# Altium PCB TuringSMD - Copy.PcbDoc (part 1 of 2)
Units mm, origin at the board's own origin, x right, y up, seen from the top; angles counter-clockwise.
Board outline 28 x 100 mm, 2 copper layers (Top Layer, Bottom Layer); 77 components, 85 nets, 274 pads, 71 vias.
Unrouted connection lines stored in the file: 107.
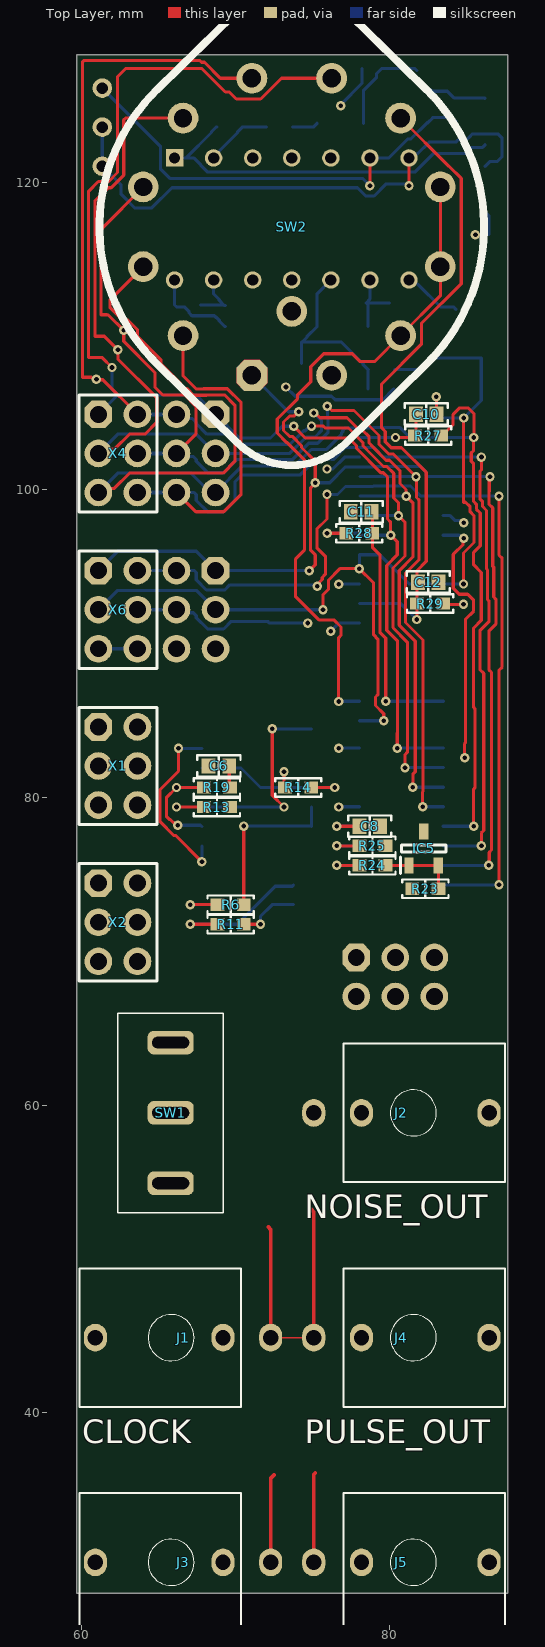
[diagram p0: Top Layer view]
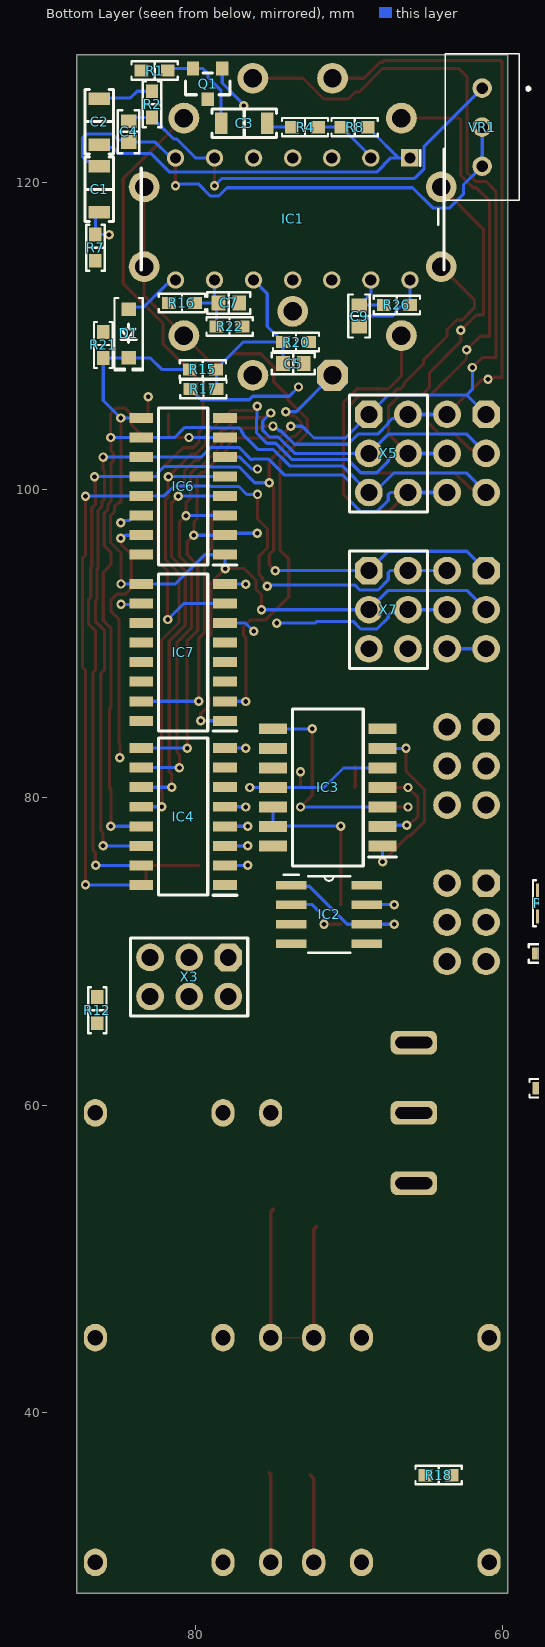
[diagram p1: Bottom Layer view, seen from below]

## Layer stack, top to bottom
Top Solder: solder mask 0.0102, Solder Resist, Dk 3.5
Top Layer: signal copper 0.0356
Dielectric 1: dielectric 0.32, FR-4, Dk 4.8
Bottom Layer: signal copper 0.0356
Bottom Solder: solder mask 0.0102, Solder Resist, Dk 3.5

## Board outline
59.69,28.27 59.69,128.27 87.69,128.27 87.69,28.27

## Design rules (kind name [scope] priority, off if disabled: settings)
BoardOutlineClearance [All] p1: gap=0.254 ignorepadtopadclearanceinfootprint=FALSE except(0: Arc-SplitContinuation Track-SplitContinuation SMDPad-SplitContinuation THPad-SplitContinuation Via-SplitContinuation Fill-SplitContinuation Poly-SplitContinuation Region-SplitContinuation Text-SplitContinuation)
Clearance [All] p1: gap=0.254 ignorepadtopadclearanceinfootprint=FALSE except(0.203: Arc-Arc Arc-Track Arc-SMDPad Arc-Fill Arc-Poly Arc-Region Track-Track Track-SMDPad Track-Fill Track-Poly Track-Region SMDPad-SMDPad SMDPad-Fill SMDPad-Poly SMDPad-Region)
PolygonConnect [All] p1: thpad.connectstyle=Relief thpad.reliefconductorwidth=0.254 thpad.reliefentries=4 thpad.polygonreliefangle="90 Angle" thpad.airgapwidth=0.254 smdpad.connectstyle=Relief smdpad.reliefconductorwidth=0.254 smdpad.reliefentries=4 smdpad.polygonreliefangle="90 Angle" smdpad.airgapwidth=0.254 via.connectstyle=Direct via.reliefconductorwidth=0.254 via.reliefentries=4 via.polygonreliefangle="90 Angle" via.airgapwidth=0.254
RoutingVias [All] p1: holewidth=0.305 width=0.61 viastyle="Through Hole" minholewidth=0.305 minwidth=0.61 maxholewidth=0.305 maxwidth=0.61
SolderMaskExpansion [All] p1: expansion=0.102 istentingtop=FALSE
Width [All] p1: maxlimit=0.635 minlimit=0.203 preferedwidth=0.203
30 further rules are at their usual default settings.

## Components (designator, comment, footprint, x,y, rotation, side; value= is the part's Value field where it differs from the comment)
C1 "0.47 µF" "CAP FILM 1206" 86.233,119.531 r270 bottom
C2 "0.47 µF" "CAP FILM 1206" 86.233,123.928 r90 bottom
C3 "0.47 µF" "CAP FILM 1206" 76.811,123.825 r180 bottom
C4 "1000 pF" "CAP 0603_1608" 84.328,123.277 r270 bottom
C5 "330 pF" "CAP 0603_1608" 73.62,108.204 r0 bottom
C6 "1000 pF" "CAP 0603_1608" 68.921,82.042 r0 top
C7 "0.1 µF" "CAP 0603_1608" 77.811,112.141 r0 bottom
C8 "10000 pF" "CAP 0603_1608" 78.731,78.121 r180 top
C9 "1000 pF" "CAP 0603_1608" 69.342,111.292 r270 bottom
C10 "1000 pF" "CAP 0603_1608" 82.403,104.918 r180 top
C11 "1000 pF" "CAP 0603_1608" 78.172,98.568 r0 top
C12 "1000 pF" "CAP 0603_1608" 82.53,93.996 r180 top
C13 "0.1 µF" "CAP 0603_1608" 136.144,59.944 r270 bottom
C14 "0.1 µF" "CAP 0603_1608" 141.732,59.944 r270 bottom
C15 "0.1 µF" "CAP 0603_1608" 147.32,59.944 r270 bottom
C16 "0.1 µF" "CAP 0603_1608" 152.908,59.944 r270 bottom
C17 "0.1 µF" "CAP 0603_1608" 158.496,59.944 r270 bottom
C18 "0.1 µF" "CAP 0603_1608" 164.084,59.944 r270 bottom
C19 "0.1 µF" "CAP 0603_1608" 101.854,59.944 r270 bottom
C20 "0.1 µF" "CAP 0603_1608" 107.442,59.944 r270 bottom
C21 "0.1 µF" "CAP 0603_1608" 114.046,60.706 r0 bottom
C22 "0.1 µF" "CAP 0603_1608" 118.618,59.944 r270 bottom
C23 "0.1 µF" "CAP 0603_1608" 124.46,59.944 r270 bottom
C24 "0.1 µF" "CAP 0603_1608" 130.302,59.944 r270 bottom
D1 "1N4148W-TP" SOD-123 84.328,110.16 r270 bottom
IC1 "TL074CN" DIP794W53P254L1930H508Q14N 73.66,117.602 r270 bottom
IC2 "TL072ACP" SOIC-8 71.298,72.39 r180 bottom
IC3 "CD4016BNSR" SOIC127P780X200-14N 71.374,80.645 r0 bottom
IC4 "DAC0800LCM_NOPB" SOIC127P600X175-16N 80.781,78.756 r0 bottom
IC5 "TL431MFDT,215" SOT95P230X110-3N 82.239,76.681 r90 top
IC6 "CD4015BM96" SOIC127P600X175-16N 80.781,100.219 r0 bottom
IC7 "CD4015BM96" SOIC127P600X175-16N 80.781,89.424 r0 bottom
J1 "CLOCK" THONKICONN 72.29,44.879 r90 top
J2 "NOISE_OUT" THONKICONN 75.09,59.488 r270 top
J3 "CV_IN" THONKICONN 72.29,30.27 r90 top
J4 "PULSE_OUT" THONKICONN 75.09,44.879 r270 top
J5 "CV OUT" THONKICONN 75.09,30.27 r270 top
Q1 "MMBT3904-7-F" "DIODES SOT-23-3" 79.187,126.381 r270 bottom
R1 "100 kOhms" "YAGEO RES 0603_1608" 82.638,127.254 r0 bottom
R2 "1 kOhms" "YAGEO RES 0603_1608" 82.804,125.056 r90 bottom
R3 "1 kOhms" "YAGEO RES 0603_1608" 56.769,61.087 r0 bottom
R4 "10 kOhms" "YAGEO RES 0603_1608" 72.859,123.571 r0 bottom
R5 "10 kOhms" "YAGEO RES 0603_1608" 56.046,73.113 r90 bottom
R6 "100 kOhms" "YAGEO RES 0603_1608" 69.684,73.025 r0 top
R7 "100 kOhms" "YAGEO RES 0603_1608" 86.487,115.736 r270 bottom
R8 "470 kOhms" "YAGEO RES 0603_1608" 69.635,123.571 r180 bottom
R9 "100 kOhms" "YAGEO RES 0603_1608" 57.443,73.113 r90 bottom
R10 "10 kOhms" "YAGEO RES 0603_1608" 56.808,69.85 r0 bottom
R11 "47 kOhms" "YAGEO RES 0603_1608" 69.684,71.755 r180 top
R12 "1 kOhms" "YAGEO RES 0603_1608" 86.36,66.167 r270 bottom
R13 "10 kOhms" "YAGEO RES 0603_1608" 68.795,79.375 r0 top
R14 "10 kOhms" "YAGEO RES 0603_1608" 74.08,80.645 r180 top
R15 "470 kOhms" "YAGEO RES 0603_1608" 79.502,107.823 r0 bottom
R16 "68 kOhms" "YAGEO RES 0603_1608" 80.86,112.141 r0 bottom
R17 "15 kOhms" "YAGEO RES 0603_1608" 79.463,106.553 r0 bottom
R18 "51 kOhms" "YAGEO RES 0603_1608" 64.174,35.941 r0 bottom
R19 "10 kOhms" "YAGEO RES 0603_1608" 68.795,80.645 r180 top
R20 "100 kOhms" "YAGEO RES 0603_1608" 73.445,109.601 r0 bottom
R21 "10 kOhms" "YAGEO RES 0603_1608" 85.979,109.41 r270 bottom
R22 "15 kOhms" "YAGEO RES 0603_1608" 77.763,110.617 r0 bottom
R23 "3.3 kOhms" "YAGEO RES 0603_1608" 82.344,74.057 r180 top
R24 "1.6 kOhms" "YAGEO RES 0603_1608" 78.906,75.581 r0 top
R25 "1.6 kOhms" "YAGEO RES 0603_1608" 78.906,76.851 r0 top
R26 "5.1 kOhms" "YAGEO RES 0603_1608" 66.89,112.014 r180 bottom
R27 "10 kOhms" "YAGEO RES 0603_1608" 82.529,103.521 r0 top
R28 "10 kOhms" "YAGEO RES 0603_1608" 78.046,97.171 r180 top
R29 "10 kOhms" "YAGEO RES 0603_1608" 82.656,92.599 r0 top
SW1 "Toggle SW" "TOGGLE SW" 65.786,59.488 r0 top
SW2 "SW Rotary" SW_ROTARY 73.66,117.094 r180 top
VR1 "1meg" 3296X1223LF 61.341,123.571 r0 bottom
X1 "Connector, 6pin, 2.54mm, 500VAC, 3A" "CON: PBD-6" 62.357,82.042 r270 top
X2 "Connector, 6pin, 2.54mm, 500VAC, 3A" "CON: PBD-6" 62.357,71.882 r270 top
X3 "Connector, 6pin, 2.54mm, 500VAC, 3A" "CON: PBD-6" 80.391,68.326 r0 bottom
X4 "Connector, 6pin, 2.54mm, 500VAC, 3A" "CON: PBD-6" 62.357,102.362 r270 top
X5 "Connector, 6pin, 2.54mm, 500VAC, 3A" "CON: PBD-6" 67.437,102.362 r270 bottom
X6 "Connector, 6pin, 2.54mm, 500VAC, 3A" "CON: PBD-6" 62.357,92.202 r270 top
X7 "Connector, 6pin, 2.54mm, 500VAC, 3A" "CON: PBD-6" 67.437,92.202 r270 bottom

## Footprints (in the part's own frame and the unit in brackets; to place one, negate y for a bottom-side part, rotate by r counter-clockwise, add the part's x,y. Pads: shape width x height; smd on the part's side, far side on the other; paste and mask are expansions set on the pad)
3296X1223LF [mm]
  round 1.269 hole 0.74: 1(0,-2.54) 2(0,0) 3(0,2.54)
  silkscreen extent -3.1,-4.76 2.41,4.76, body extent -2.07,-4.75 2.76,6.3, height 10.03
"CAP 0603_1608" [mm] "Chip Capacitor, 2-Leads, Body 1.60x0.80mm, IPC Medium Density"
  rect 0.9x1 smd: 1(-0.675,0) 2(0.675,0)
  silkscreen extent -1.4,-0.7 1.4,0.7, body extent -0.8,-0.41 0.8,0.41, height 0.82
"CAP FILM 1206" [mm] "H1, Film Capacitor PPS, 2-Leads, Body 3.20x1.60mm, IPC Medium Density"
  rect 0.8x1.4 smd: 1(-1.5,0) 2(1.5,0)
  silkscreen extent -2.1,-0.92 2.1,0.92, body extent -1.6,-0.8 1.6,0.8, height 1
"CON: PBD-6" [mm] "PBD-6"
  oct 1.8x1.8 hole 1.1: 1(-2.54,-1.27)
  round 1.8 hole 1.1: 2(-2.54,1.27) 3(0,-1.27) 4(0,1.27) 5(2.54,-1.27) 6(2.54,1.27)
  silkscreen extent -3.81,-2.54 3.81,2.54, body extent -3.81,-2.54 3.81,2.54, height 8.5
"DIODES SOT-23-3" [mm] "SOT23, 3-Leads, Body 2.90x2.40mm, Pitch 0.95mm, IPC Medium Density"
  rect 0.9x0.8 smd: 1(-1,0.95) 2(-1,-0.95) 3(1,0)
  silkscreen extent -0.7,-1.45 0.7,1.45, body extent -1.41,-1.45 1.41,1.45, height 1.5
DIP794W53P254L1930H508Q14N [mm]
  rect 1.13x1.13 hole 0.73: 1(-3.97,7.62)
  round 1.13 hole 0.73: 2(-3.97,5.08) 3(-3.97,2.54) 4(-3.97,0) 5(-3.97,-2.54) 6(-3.97,-5.08) 7(-3.97,-7.62) 8(3.97,-7.62) 9(3.97,-5.08) 10(3.97,-2.54) 11(3.97,0) 12(3.97,2.54) 13(3.97,5.08) 14(3.97,7.62)
  silkscreen extent -4.53,-9.84 3.3,9.84, body extent -3.94,-9.84 3.94,9.84, height 5.27
SOD-123 [mm] "SOD, 2-Leads, Body 1.55x3.70mm, IPC Medium Density"
  rect 0.9x0.95 smd: 1(-1.575,0) 2(1.575,0)
  silkscreen extent -2.3,-0.92 2.41,0.92, body extent -1.86,-0.78 1.86,0.77, height 1.35
SOIC127P600X175-16N [mm]
  rect 1.55x0.65 smd: 1(-2.725,4.445) 2(-2.725,3.175) 3(-2.725,1.905) 4(-2.725,0.635) 5(-2.725,-0.635) 6(-2.725,-1.905) 7(-2.725,-3.175) 8(-2.725,-4.445) 9(2.725,-4.445) 10(2.725,-3.175) 11(2.725,-1.905) 12(2.725,-0.635) 13(2.725,0.635) 14(2.725,1.905) 15(2.725,3.175) 16(2.725,4.445)
  silkscreen extent -3.5,-5.1 1.6,5.12, body extent -3,-5.1 3,5.1, height 1.75
SOIC127P780X200-14N [mm]
  rect 1.825x0.7 smd: 1(-3.562,3.81) 2(-3.562,2.54) 3(-3.562,1.27) 4(-3.562,0) 5(-3.562,-1.27) 6(-3.562,-2.54) 7(-3.562,-3.81) 8(3.562,-3.81) 9(3.562,-2.54) 10(3.562,-1.27) 11(3.562,0) 12(3.562,1.27) 13(3.562,2.54) 14(3.562,3.81)
  silkscreen extent -4.47,-5.1 2.3,5.1, body extent -3.9,-5.1 3.9,5.1, height 2
SOIC-8 [mil]
  rect 78x22 smd: 1(-97,75) 2(-97,25) 3(-97,-25) 4(-97,-75) 5(97,-75) 6(97,-25) 7(97,25) 8(97,75)
  silkscreen extent -117,-98 54,101, body extent -116,-96 116,96, height 65
SOT95P230X110-3N [mm]
  rect 1.05x0.6 smd: 1(-1.1,0.95) 2(-1.1,-0.95) 3(1.1,0)
  silkscreen extent -1.63,-1.45 0.23,1.5, body extent -1.2,-1.45 1.2,1.45, height 0.95
SW_ROTARY [mm] "RS25 rotary switch from ali"
  oct 2x2 hole 1.2: 1(2.588,9.659)
  round 2 hole 1.2: 2(7.071,7.071) 3(9.659,2.588) 4(9.659,-2.588) 5(7.071,-7.071) 6(2.588,-9.659) 7(-2.588,-9.659) 8(-7.071,-7.071) 9(-9.659,-2.588) 10(-9.659,2.588) 11(-7.071,7.071) 12(-2.588,9.659) A(0,5.5)
  Top Layer region: 1.588,10.159 2.088,10.659 3.088,10.659 3.588,10.159 3.588,9.159 3.088,8.659 2.088,8.659 1.588,9.159
  Bottom Layer region: 1.588,10.159 2.088,10.659 3.088,10.659 3.588,10.159 3.588,9.159 3.088,8.659 2.088,8.659 1.588,9.159
  silkscreen extent -12.5,-15.5 12.5,15.5, body extent -12.5,-15.5 12.5,15.5, height 31
THONKICONN [mm]
  oval 1.8x1.5 hole 1: 1(0,0) 2(0,3.1) 3(0,11.4)
  silkscreen extent -4.5,1.93 4.5,12.42, body extent -4.47,-0.18 4.53,12.45, height 14.5
"TOGGLE SW" [mil] "3 PIN TOGGLE SWITCH SPDT"
  rrect50% 118.11x60 hole 30 slot 94.49 at 0 deg: 1(0,180) 2(0,0) 3(0,-180)
  silkscreen extent -135,-255 135,255, body extent -236,-251 237,278, height 1129
"YAGEO RES 0603_1608" [mm] "Chip Resistor, 2-Leads, Body 1.60x0.80mm"
  rect 0.9x0.8 smd: 1(-0.85,0) 2(0.85,0)
  silkscreen extent -1.5,-0.6 1.5,0.6, body extent -0.8,-0.4 0.8,0.4, height 0.45

## Part data
C1 C2 C3: library part ECP-U1C474MA5, "CAP FILM 0.47UF 20% 16VDC 1206", Device Package="1206 (3216 Metric)", Dielectric Material="Acrylic, Metallized - Stacked", Manufacturer="Panasonic Electronic Components", Operating Temperature="-40°C ~ 85°C", Supplier Part Number 1=PCF1130CT-ND, Tolerance=±20%, Voltage Rating - AC=12V, Voltage Rating - DC=16V, Applications="EMI, RFI Suppression", Capacitance="0.47 µF", ComponentLink1Description=Datasheet, ComponentLink1URL=http://industrial.panasonic.com/www-cgi/jvcr13pz.cgi?E+PZ+3+ABD0012+ECPU1C474MA5+7+WW, ComponentLink2Description="DigiKey Link", ComponentLink2URL=https://www.digikey.com/en/products/detail/panasonic-electronic-components/ECP-U1C474MA5/285450, Features="Low ESR", Height - Seated (Max)="0.063\" (1.60mm)", LastUpdated="6/3/2024 8:14:42 PM", Lifecycle Status=Active, Minimum Order=1, Mounting Type="Surface Mount", Package / Case="1206 (3216 Metric)", Packaging=TapeAndReel, Part Number=ECP-U1C474MA5, Part Status=Active, Price=0.22, Series=ECP-U(A), Size / Dimension="0.126\" L x 0.063\" W (3.20mm x 1.60mm)", Supplier 1=DigiKey, Termination="Solder Pads"
C4 C6 C9 C10 C11 C12: library part C1608X8R1H102K080AA, "CAP CER 1000PF 50V X8R 0603", Device Package="0603 (1608 Metric)", Manufacturer="TDK Corporation", Operating Temperature="-55°C ~ 150°C", Supplier Part Number 1=445-2501-1-ND, Temperature Coefficient=X8R, Tolerance=±10%, Voltage - Rated=50V, Applications="General Purpose", Capacitance="1000 pF", ComponentLink1Description=Datasheet, ComponentLink1URL=https://product.tdk.com/info/en/catalog/datasheets/mlcc_commercial_hightemp_en.pdf?ref_disty=digikey, ComponentLink2Description="DigiKey Link", ComponentLink2URL=https://www.digikey.com/en/products/detail/tdk-corporation/C1608X8R1H102K080AA/927127, Features="High Temperature", LastUpdated="2/9/2024 8:10:30 PM", Lifecycle Status=Active, Minimum Order=1, Mounting Type="Surface Mount, MLCC", Package / Case="0603 (1608 Metric)", Packaging=TapeAndReel, Part Number=C1608X8R1H102K080AA, Part Status=Active, PartId=2708, Price=0.01, Series=C, Size / Dimension="0.063\" L x 0.031\" W (1.60mm x 0.80mm)", Supplier 1=DigiKey, Thickness (Max)="0.035\" (0.90mm)"
C5: library part AC0603JRNPO9BN331, "CAP CER 330PF 50V C0G/NPO 0603", Device Package="0603 (1608 Metric)", Manufacturer=Yageo, Operating Temperature="-55°C ~ 125°C", Ratings=AEC-Q200, Supplier Part Number 1=311-3280-1-ND, Temperature Coefficient="C0G, NP0", Tolerance=±5%, Voltage - Rated=50V, Applications=Automotive, Capacitance="330 pF", ComponentLink1Description=Datasheet, ComponentLink1URL=http://www.yageo.com/NewPortal/_en/search/productDocs.jsp?YageoPartNumber=AC0603JRNPO9BN331, ComponentLink2Description="DigiKey Link", ComponentLink2URL=https://www.digikey.com/en/products/detail/yageo/AC0603JRNPO9BN331/6643266, LastUpdated="2/9/2024 8:10:30 PM", Lifecycle Status=Active, Minimum Order=1, Mounting Type="Surface Mount, MLCC", Package / Case="0603 (1608 Metric)", Packaging=TapeAndReel, Part Number=AC0603JRNPO9BN331, Part Status=Active, PartId=2321, Price=0.01, Series=AC, Size / Dimension="0.063\" L x 0.031\" W (1.60mm x 0.80mm)", Supplier 1=DigiKey, Thickness (Max)="0.035\" (0.90mm)"
C7 C13 C14 C15 C16 C17 C18 C19 C20 C21 C22 C23 C24: library part C0603C104K5RAC7411, "CAP CER 0.1UF 50V X7R 0603", Device Package="0603 (1608 Metric)", Manufacturer=KEMET, Operating Temperature="-55°C ~ 125°C", Supplier Part Number 1=399-C0603C104K5RAC7411CT-ND, Temperature Coefficient=X7R, Tolerance=±10%, Voltage - Rated=50V, Applications="Bypass, Decoupling", Capacitance="0.1 µF", ComponentLink1Description=Datasheet, ComponentLink1URL=https://api.kemet.com/component-edge/download/datasheet/C0603C104K5RAC7411.pdf, ComponentLink2Description="DigiKey Link", ComponentLink2URL=https://www.digikey.com/en/products/detail/kemet/C0603C104K5RAC7411/3317013, LastUpdated="2/9/2024 8:10:30 PM", Lifecycle Status=Active, Minimum Order=1, Mounting Type="Surface Mount, MLCC", Package / Case="0603 (1608 Metric)", Packaging=TapeAndReel, Part Number=C0603C104K5RAC7411, Part Status=Active, PartId=2233, Price=0.01, Series="SMD Comm X7R", Size / Dimension="0.063\" L x 0.031\" W (1.60mm x 0.80mm)", Supplier 1=DigiKey, Thickness (Max)="0.035\" (0.90mm)"
C8: library part CGA3E2X8R1H103K080AA, "CAP CER 10000PF 50V X8R 0603", Device Package="0603 (1608 Metric)", Manufacturer="TDK Corporation", Operating Temperature="-55°C ~ 150°C", Ratings=AEC-Q200, Supplier Part Number 1=445-5892-1-ND, Temperature Coefficient=X8R, Tolerance=±10%, Voltage - Rated=50V, Applications=Automotive, Capacitance="10000 pF", ComponentLink1Description=Datasheet, ComponentLink1URL=https://product.tdk.com/info/en/catalog/datasheets/mlcc_automotive_hightemp_en.pdf?ref_disty=digikey, ComponentLink2Description="DigiKey Link", ComponentLink2URL=https://www.digikey.com/en/products/detail/tdk-corporation/CGA3E2X8R1H103K080AA/2443370, Features="High Temperature", LastUpdated="2/9/2024 8:10:29 PM", Lifecycle Status=Active, Minimum Order=1, Mounting Type="Surface Mount, MLCC", Package / Case="0603 (1608 Metric)", Packaging=TapeAndReel, Part Number=CGA3E2X8R1H103K080AA, Part Status=Active, PartId=2732, Price=0.01, Series=CGA, Size / Dimension="0.063\" L x 0.031\" W (1.60mm x 0.80mm)", Supplier 1=DigiKey, Thickness (Max)="0.035\" (0.90mm)"
D1: "DIODE GEN PURP 100V 150MA SOD123", Capacitance @ Vr, F="2pF @ 0V, 1MHz", Current - Average Rectified (Io)=150mA, Current - Reverse Leakage @ Vr="1 µA @ 75 V", Manufacturer="Micro Commercial Co", Operating Temperature - Junction="-65°C ~ 150°C", Package / Case=SOD-123, Supplier Part Number 1=1N4148WTPMSCT-ND, Voltage - DC Reverse (Vr) (Max)="100 V", Voltage - Forward (Vf) (Max) @ If="1.25 V @ 150 mA", ComponentLink1Description=Datasheet, ComponentLink1URL=https://www.mccsemi.com/pdf/Products/1N4148W(SOD123).pdf, ComponentLink2Description="DigiKey Link", ComponentLink2URL=https://www.digikey.com/en/products/detail/micro-commercial-co/1N4148W-TP/717196, Diode Type=Standard, LastUpdated="6/3/2024 7:54:46 PM", Lifecycle Status=Active, Minimum Order=1, Mounting Type="Surface Mount", Packaging=TapeAndReel, Part Number=1N4148W-TP, Part Status=Active, PartId=999, Price=0.01, Reverse Recovery Time (trr)="4 ns", Series=-, Speed="Small Signal =< 200mA (Io), Any Speed", Supplier 1=DigiKey, Supplier Device Package=SOD-123
IC1: "Integrated Circuit", Manufacturer_Name="Texas Instruments", Mouser Part Number=595-TL074CN, Arrow Part Number=TL074CN, Arrow Price/Stock=https://www.arrow.com/en/products/tl074cn/texas-instruments?utm_currency=USD&region=nac, Datasheet Link=https://www.ti.com/lit/ds/symlink/tl074.pdf?HQS=TI-null-null-mousermode-df-pf-null-wwe&ts=1598513500878&ref_url=https%253A%252F%252Feu.mouser.com%252F, Height=5.08mm, Manufacturer_Part_Number=TL074CN, Mouser Price/Stock=https://www.mouser.co.uk/ProductDetail/Texas-Instruments/TL074CN?qs=AMJt07B76uv7dLYnj7iLiQ%3D%3D
IC2: "Integrated Circuit", Manufacturer_Name="Texas Instruments", Mouser Part Number=595-TL072ACP, Arrow Part Number=TL072ACP, Arrow Price/Stock=https://www.arrow.com/en/products/tl072acp/texas-instruments?utm_currency=USD&region=europe, Datasheet Link=http://www.ti.com/lit/ds/symlink/tl071a.pdf, Height=5.08mm, Manufacturer_Part_Number=TL072ACP, Mouser Price/Stock=https://www.mouser.co.uk/ProductDetail/Texas-Instruments/TL072ACP?qs=0OT4q4QBUTLFvIZ%252B%2FvrwoQ%3D%3D
IC3: "Integrated Circuit", Manufacturer_Name="Texas Instruments", Mouser Part Number=595-CD4016BNSR, Arrow Part Number=CD4016BNSR, Arrow Price/Stock=https://www.arrow.com/en/products/cd4016bnsr/texas-instruments?utm_currency=USD&region=nac, Datasheet Link=https://www.ti.com/lit/ds/symlink/cd4016b.pdf?ts=1617176409786&ref_url=https%253A%252F%252Fwww.ti.com%252Fstore%252Fti%252Fen%252Fp%252Fproduct%252F%253Fp%253DCD4016BNSR%2526keyMatch%253DCD4016BNSR%2526tisearch%253Dsearch-everything%2526usecase%253DOPN, Height=2mm, Manufacturer_Part_Number=CD4016BNSR, Mouser Price/Stock=https://www.mouser.co.uk/ProductDetail/Texas-Instruments/CD4016BNSR?qs=DXdcjUGny5PNUtZB%252BpoaOA%3D%3D
IC4: "Integrated Circuit", Arrow Part Number=DAC0800LCM/NOPB, Manufacturer_Name="Texas Instruments", Mouser Part Number=926-DAC0800LCM/NOPB, Arrow Price/Stock=https://www.arrow.com/en/products/dac0800lcmnopb/texas-instruments?utm_currency=USD&region=europe, Datasheet Link=http://www.ti.com/lit/ds/symlink/dac0800.pdf, Height=1.75mm, Manufacturer_Part_Number=DAC0800LCM/NOPB, Mouser Price/Stock=https://www.mouser.co.uk/ProductDetail/Texas-Instruments/DAC0800LCM-NOPB?qs=7X5t%252BdzoRHB3UMLDAB6Vww%3D%3D
IC5: "Integrated Circuit", Manufacturer_Name=Nexperia, Mouser Part Number=771-TL431MFDT215, Arrow Part Number=TL431MFDT,215, Arrow Price/Stock=https://www.arrow.com/en/products/tl431mfdt215/nexperia?utm_currency=USD&region=nac, Datasheet Link=https://assets.nexperia.com/documents/data-sheet/TL431_FAM.pdf, Height=1.1mm, Manufacturer_Part_Number=TL431MFDT,215, Mouser Price/Stock=https://www.mouser.co.uk/ProductDetail/Nexperia/TL431MFDT215?qs=A1cBxND5mHKvFzVl3lBdcQ%3D%3D
IC6 IC7: "Integrated Circuit", Manufacturer_Name="Texas Instruments", Mouser Part Number=595-CD4015BM96, Arrow Part Number=CD4015BM96, Arrow Price/Stock=https://www.arrow.com/en/products/cd4015bm96/texas-instruments?region=nac, Datasheet Link=http://www.ti.com/general/docs/lit/getliterature.tsp?genericPartNumber=CD4015B&&fileType=pdf, Height=1.75mm, Manufacturer_Part_Number=CD4015BM96, Mouser Price/Stock=https://www.mouser.co.uk/ProductDetail/Texas-Instruments/CD4015BM96?qs=vmM6vcLFxxH3zP0zlXu8Qg%3D%3D
J1 J2 J3 J4 J5: library part PJ-301M-3P, "THONKICONN metal"
Q1: "TRANS NPN 40V 0.2A SOT23-3", Current - Collector (Ic) (Max)="200 mA", Current - Collector Cutoff (Max)="50nA (ICBO)", DC Current Gain (hFE) (Min) @ Ic, Vce="100 @ 10mA, 1V", Frequency - Transition=300MHz, Manufacturer="Diodes Incorporated", Operating Temperature="-55°C ~ 150°C (TJ)", Package / Case="TO-236-3, SC-59, SOT-23-3", Power - Max="300 mW", Supplier Device Package=SOT-23-3, Supplier Part Number 1=MMBT3904-FDICT-ND, Voltage - Collector Emitter Breakdown (Max)="40 V", ComponentLink1Description=Datasheet, ComponentLink1URL=https://www.diodes.com/assets/Datasheets/ds30036.pdf, ComponentLink2Description="DigiKey Link", ComponentLink2URL=https://www.digikey.com/en/products/detail/diodes-incorporated/MMBT3904-7-F/814494, LastUpdated="6/3/2024 8:24:11 PM", Lifecycle Status=Active, Minimum Order=1, Mounting Type="Surface Mount", Packaging=TapeAndReel, Part Number=MMBT3904-7-F, Part Status=Active, PartId=85, Price=0.01, Series=-, Supplier 1=DigiKey, Transistor Type=NPN, Vce Saturation (Max) @ Ib, Ic="300mV @ 5mA, 50mA"
R1 R6 R7 R9 R20: library part AA0603FR-07100KL, "RES SMD 100K OHM 1% 1/10W 0603", Device Package="0603 (1608 Metric)", Manufacturer=Yageo, Operating Temperature="-55°C ~ 155°C", Power (Watts)="0.1W, 1/10W", Ratings=AEC-Q200, Supplier Device Package=0603, Supplier Part Number 1=13-AA0603FR-07100KLCT-ND, Temperature Coefficient=±150ppm/°C, Tolerance=±1%, ComponentLink1Description=Datasheet, ComponentLink1URL=https://www.yageo.com/upload/media/product/productsearch/datasheet/rchip/PYu-AA_51_RoHS_L_3.pdf, ComponentLink2Description="DigiKey Link", ComponentLink2URL=https://www.digikey.com/en/products/detail/yageo/AA0603FR-07100KL/5888687, Composition="Thick Film", Features="Anti-Sulfur, Automotive AEC-Q200, Moisture Resistant", Height - Seated (Max)="0.022\" (0.55mm)", LastUpdated="7/25/2024 9:19:03 AM", Lifecycle Status=Active, Minimum Order=1, Number of Terminations=2, Package / Case="0603 (1608 Metric)", Packaging=TapeAndReel, Part Number=AA0603FR-07100KL, PartId=78895, Price=0.01, Resistance="100 kOhms", Series=AA, Size / Dimension="0.063\" L x 0.031\" W (1.60mm x 0.80mm)", Supplier 1=DigiKey
R2 R3 R12: library part AA0603FR-071KL, "RES SMD 1K OHM 1% 1/10W 0603", Device Package="0603 (1608 Metric)", Manufacturer=Yageo, Operating Temperature="-55°C ~ 155°C", Power (Watts)="0.1W, 1/10W", Ratings=AEC-Q200, Supplier Device Package=0603, Supplier Part Number 1=13-AA0603FR-071KLCT-ND, Temperature Coefficient=±150ppm/°C, Tolerance=±1%, ComponentLink1Description=Datasheet, ComponentLink1URL=https://www.yageo.com/upload/media/product/productsearch/datasheet/rchip/PYu-AA_51_RoHS_L_3.pdf, ComponentLink2Description="DigiKey Link", ComponentLink2URL=https://www.digikey.com/en/products/detail/yageo/AA0603FR-071KL/5888847, Composition="Thick Film", Features="Anti-Sulfur, Automotive AEC-Q200, Moisture Resistant", Height - Seated (Max)="0.022\" (0.55mm)", LastUpdated="7/25/2024 9:19:15 AM", Lifecycle Status=Active, Minimum Order=1, Number of Terminations=2, Package / Case="0603 (1608 Metric)", Packaging=TapeAndReel, Part Number=AA0603FR-071KL, Part Status=Active, PartId=64335, Price=0.01, Resistance="1 kOhms", Series=AA, Size / Dimension="0.063\" L x 0.031\" W (1.60mm x 0.80mm)", Supplier 1=DigiKey
R4 R5 R10 R13 R14 R19 R21 R27 R28 R29: library part AA0603FR-0710KL, "RES SMD 10K OHM 1% 1/10W 0603", Device Package="0603 (1608 Metric)", Manufacturer=Yageo, Operating Temperature="-55°C ~ 155°C", Power (Watts)="0.1W, 1/10W", Ratings=AEC-Q200, Supplier Device Package=0603, Supplier Part Number 1=13-AA0603FR-0710KLCT-ND, Temperature Coefficient=±150ppm/°C, Tolerance=±1%, ComponentLink1Description=Datasheet, ComponentLink1URL=https://www.yageo.com/upload/media/product/productsearch/datasheet/rchip/PYu-AA_51_RoHS_L_3.pdf, ComponentLink2Description="DigiKey Link", ComponentLink2URL=https://www.digikey.com/en/products/detail/yageo/AA0603FR-0710KL/5888698, Composition="Thick Film", Features="Anti-Sulfur, Automotive AEC-Q200, Moisture Resistant", Height - Seated (Max)="0.022\" (0.55mm)", LastUpdated="7/25/2024 9:19:15 AM", Lifecycle Status=Active, Minimum Order=1, Number of Terminations=2, Package / Case="0603 (1608 Metric)", Packaging=TapeAndReel, Part Number=AA0603FR-0710KL, Part Status=Active, PartId=64302, Price=0.01, Resistance="10 kOhms", Series=AA, Size / Dimension="0.063\" L x 0.031\" W (1.60mm x 0.80mm)", Supplier 1=DigiKey
R8 R15: library part AC0603FR-07470KL, "RES SMD 470K OHM 1% 1/10W 0603", Device Package="0603 (1608 Metric)", Manufacturer=Yageo, Operating Temperature="-55°C ~ 155°C", Power (Watts)="0.1W, 1/10W", Ratings=AEC-Q200, Supplier Device Package=0603, Supplier Part Number 1=YAG3609CT-ND, Temperature Coefficient=±100ppm/°C, Tolerance=±1%, ComponentLink1Description=Datasheet, ComponentLink1URL=https://www.yageo.com/upload/media/product/productsearch/datasheet/rchip/PYu-AC_51_RoHS_L_7.pdf, ComponentLink2Description="DigiKey Link", ComponentLink2URL=https://www.digikey.com/en/products/detail/yageo/AC0603FR-07470KL/5896138, Composition="Thick Film", Features="Automotive AEC-Q200, Moisture Resistant", Height - Seated (Max)="0.022\" (0.55mm)", LastUpdated="7/25/2024 9:19:25 AM", Lifecycle Status=Active, Minimum Order=1, Number of Terminations=2, Package / Case="0603 (1608 Metric)", Packaging=CutTape, Part Number=AC0603FR-07470KL, Part Status=Active, PartId=15826, Price=0.01, Resistance="470 kOhms", Series=AC, Size / Dimension="0.063\" L x 0.031\" W (1.60mm x 0.80mm)", Supplier 1=DigiKey
R11: library part AC0603FR-0747KL, "RES SMD 47K OHM 1% 1/10W 0603", Device Package="0603 (1608 Metric)", Manufacturer=Yageo, Operating Temperature="-55°C ~ 155°C", Power (Watts)="0.1W, 1/10W", Ratings=AEC-Q200, Supplier Device Package=0603, Supplier Part Number 1=YAG3610CT-ND, Temperature Coefficient=±100ppm/°C, Tolerance=±1%, ComponentLink1Description=Datasheet, ComponentLink1URL=https://www.yageo.com/upload/media/product/productsearch/datasheet/rchip/PYu-AC_51_RoHS_L_7.pdf, ComponentLink2Description="DigiKey Link", ComponentLink2URL=https://www.digikey.com/en/products/detail/yageo/AC0603FR-0747KL/5896142, Composition="Thick Film", Features="Automotive AEC-Q200, Moisture Resistant", Height - Seated (Max)="0.022\" (0.55mm)", LastUpdated="7/25/2024 9:19:23 AM", Lifecycle Status=Active, Minimum Order=1, Number of Terminations=2, Package / Case="0603 (1608 Metric)", Packaging=CutTape, Part Number=AC0603FR-0747KL, Part Status=Active, PartId=17391, Price=0.01, Resistance="47 kOhms", Series=AC, Size / Dimension="0.063\" L x 0.031\" W (1.60mm x 0.80mm)", Supplier 1=DigiKey
R16: library part AC0603FR-0768KL, "RES SMD 68K OHM 1% 1/10W 0603", Device Package="0603 (1608 Metric)", Manufacturer=Yageo, Operating Temperature="-55°C ~ 155°C", Power (Watts)="0.1W, 1/10W", Ratings=AEC-Q200, Supplier Device Package=0603, Supplier Part Number 1=YAG3625CT-ND, Temperature Coefficient=±100ppm/°C, Tolerance=±1%, ComponentLink1Description=Datasheet, ComponentLink1URL=https://www.yageo.com/upload/media/product/productsearch/datasheet/rchip/PYu-AC_51_RoHS_L_7.pdf, ComponentLink2Description="DigiKey Link", ComponentLink2URL=https://www.digikey.com/en/products/detail/yageo/AC0603FR-0768KL/5896252, Composition="Thick Film", Features="Automotive AEC-Q200, Moisture Resistant", Height - Seated (Max)="0.022\" (0.55mm)", LastUpdated="7/25/2024 9:19:23 AM", Lifecycle Status=Active, Minimum Order=1, Number of Terminations=2, Package / Case="0603 (1608 Metric)", Packaging=CutTape, Part Number=AC0603FR-0768KL, Part Status=Active, PartId=17378, Price=0.01, Resistance="68 kOhms", Series=AC, Size / Dimension="0.063\" L x 0.031\" W (1.60mm x 0.80mm)", Supplier 1=DigiKey
R17 R22: library part AA0603FR-0715KL, "RES SMD 15K OHM 1% 1/10W 0603", Device Package="0603 (1608 Metric)", Manufacturer=Yageo, Operating Temperature="-55°C ~ 155°C", Power (Watts)="0.1W, 1/10W", Ratings=AEC-Q200, Supplier Device Package=0603, Supplier Part Number 1=13-AA0603FR-0715KLCT-ND, Temperature Coefficient=±150ppm/°C, Tolerance=±1%, ComponentLink1Description=Datasheet, ComponentLink1URL=https://www.yageo.com/upload/media/product/app/datasheet/rchip/pyu-aa_51_rohs_l.pdf, ComponentLink2Description="DigiKey Link", ComponentLink2URL=https://www.digikey.com/en/products/detail/yageo/AA0603FR-0715KL/5888768, Composition="Thick Film", Features="Anti-Sulfur, Automotive AEC-Q200, Moisture Resistant", Height - Seated (Max)="0.022\" (0.55mm)", LastUpdated="7/25/2024 9:18:54 AM", Lifecycle Status=Active, Minimum Order=1, Number of Terminations=2, Package / Case="0603 (1608 Metric)", Packaging=TapeAndReel, Part Number=AA0603FR-0715KL, PartId=86832, Price=0.01, Resistance="15 kOhms", Series=AA, Size / Dimension="0.063\" L x 0.031\" W (1.60mm x 0.80mm)", Supplier 1=DigiKey
R18: library part AC0603FR-0751KL, "RES SMD 51K OHM 1% 1/10W 0603", Device Package="0603 (1608 Metric)", Manufacturer=Yageo, Operating Temperature="-55°C ~ 155°C", Power (Watts)="0.1W, 1/10W", Ratings=AEC-Q200, Supplier Device Package=0603, Supplier Part Number 1=YAG3616CT-ND, Temperature Coefficient=±100ppm/°C, Tolerance=±1%, ComponentLink1Description=Datasheet, ComponentLink1URL=https://www.yageo.com/upload/media/product/productsearch/datasheet/rchip/PYu-AC_51_RoHS_L_7.pdf, ComponentLink2Description="DigiKey Link", ComponentLink2URL=https://www.digikey.com/en/products/detail/yageo/AC0603FR-0751KL/5896179, Composition="Thick Film", Features="Automotive AEC-Q200, Moisture Resistant", Height - Seated (Max)="0.022\" (0.55mm)", LastUpdated="7/25/2024 9:19:23 AM", Lifecycle Status=Active, Minimum Order=1, Number of Terminations=2, Package / Case="0603 (1608 Metric)", Packaging=CutTape, Part Number=AC0603FR-0751KL, Part Status=Active, PartId=17419, Price=0.01, Resistance="51 kOhms", Series=AC, Size / Dimension="0.063\" L x 0.031\" W (1.60mm x 0.80mm)", Supplier 1=DigiKey
R23: library part AC0603FR-073K3L, "RES SMD 3.3K OHM 1% 1/10W 0603", Device Package="0603 (1608 Metric)", Manufacturer=Yageo, Operating Temperature="-55°C ~ 155°C", Power (Watts)="0.1W, 1/10W", Ratings=AEC-Q200, Supplier Device Package=0603, Supplier Part Number 1=YAG3605CT-ND, Temperature Coefficient=±100ppm/°C, Tolerance=±1%, ComponentLink1Description=Datasheet, ComponentLink1URL=https://www.yageo.com/upload/media/product/productsearch/datasheet/rchip/PYu-AC_51_RoHS_L_7.pdf, ComponentLink2Description="DigiKey Link", ComponentLink2URL=https://www.digikey.com/en/products/detail/yageo/AC0603FR-073K3L/5896085, Composition="Thick Film", Features="Automotive AEC-Q200, Moisture Resistant", Height - Seated (Max)="0.022\" (0.55mm)", LastUpdated="7/25/2024 9:19:25 AM", Lifecycle Status=Active, Minimum Order=1, Number of Terminations=2, Package / Case="0603 (1608 Metric)", Packaging=CutTape, Part Number=AC0603FR-073K3L, Part Status=Active, PartId=16436, Price=0.01, Resistance="3.3 kOhms", Series=AC, Size / Dimension="0.063\" L x 0.031\" W (1.60mm x 0.80mm)", Supplier 1=DigiKey
R24 R25: library part AC0603FR-071K6L, "RES SMD 1.6K OHM 1% 1/10W 0603", Device Package="0603 (1608 Metric)", Manufacturer=Yageo, Operating Temperature="-55°C ~ 155°C", Power (Watts)="0.1W, 1/10W", Ratings=AEC-Q200, Supplier Device Package=0603, Supplier Part Number 1=13-AC0603FR-071K6LCT-ND, Temperature Coefficient=±100ppm/°C, Tolerance=±1%, ComponentLink1Description=Datasheet, ComponentLink1URL=https://www.yageo.com/upload/media/product/productsearch/datasheet/rchip/PYu-AC_51_RoHS_L_8.pdf, ComponentLink2Description="DigiKey Link", ComponentLink2URL=https://www.digikey.com/en/products/detail/yageo/AC0603FR-071K6L/5895870, Composition="Thick Film", Features="Automotive AEC-Q200, Moisture Resistant", Height - Seated (Max)="0.022\" (0.55mm)", LastUpdated="7/25/2024 9:19:12 AM", Lifecycle Status=Active, Minimum Order=1, Number of Terminations=2, Package / Case="0603 (1608 Metric)", Packaging=CutTape, Part Number=AC0603FR-071K6L, Part Status=Active, PartId=62199, Price=0.01, Resistance="1.6 kOhms", Series=AC, Size / Dimension="0.063\" L x 0.031\" W (1.60mm x 0.80mm)", Supplier 1=DigiKey
R26: library part AC0603FR-075K1L, "RES SMD 5.1K OHM 1% 1/10W 0603", Device Package="0603 (1608 Metric)", Manufacturer=Yageo, Operating Temperature="-55°C ~ 155°C", Power (Watts)="0.1W, 1/10W", Ratings=AEC-Q200, Supplier Device Package=0603, Supplier Part Number 1=YAG3621CT-ND, Temperature Coefficient=±100ppm/°C, Tolerance=±1%, ComponentLink1Description=Datasheet, ComponentLink1URL=https://www.yageo.com/upload/media/product/productsearch/datasheet/rchip/PYu-AC_51_RoHS_L_7.pdf, ComponentLink2Description="DigiKey Link", ComponentLink2URL=https://www.digikey.com/en/products/detail/yageo/AC0603FR-075K1L/5896209, Composition="Thick Film", Features="Automotive AEC-Q200, Moisture Resistant", Height - Seated (Max)="0.022\" (0.55mm)", LastUpdated="7/25/2024 9:19:23 AM", Lifecycle Status=Active, Minimum Order=1, Number of Terminations=2, Package / Case="0603 (1608 Metric)", Packaging=CutTape, Part Number=AC0603FR-075K1L, Part Status=Active, PartId=17442, Price=0.01, Resistance="5.1 kOhms", Series=AC, Size / Dimension="0.063\" L x 0.031\" W (1.60mm x 0.80mm)", Supplier 1=DigiKey
SW1: library part "SW Toggle"
SW2: "Rotary switch"
VR1: library part 3296X-1-105LF, "Variable Resistor", Manufacturer_Name=Bourns, Mouser Part Number=652-3296X-1-105LF, Arrow Part Number=3296X-1-105LF, Arrow Price/Stock=https://www.arrow.com/en/products/3296x-1-105lf/bourns?region=nac, Datasheet Link=https://componentsearchengine.com/Datasheets/1/3296X-1-103.pdf, Height=10mm, Manufacturer_Part_Number=3296X-1-105LF, Mouser Price/Stock=https://www.mouser.co.uk/ProductDetail/Bourns/3296X-1-105LF?qs=sqUg%252BkV%252Bnc2wFy5RGGrKyA%3D%3D
X1 X2 X3 X4 X5 X6 X7: library part PBD-6, CurrentMax=3A, Manufacturer=Connfly, VoltageMax=500VAC, CommentText="\"Разъем\"", helpurl=https://www.chipdip.ru/product/pbd-6, Multichannel=6pin, PartNumber=PBD-6, Pitch=2.54mm, TypeConnector=Connector, ValueManufacturerPartNumber="Connector, 6pin, 2.54mm, 500VAC, 3A"

## Via types
v1: diameter 0.61, hole 0.305, Top Layer to Bottom Layer, 71 vias

## Nets (pads, with @x,y where several pads share a name; then routed paths per layer and width w, separated by ;. In a path a pad name is that pad's centre, name@x,y a point inside that pad or via, vN(x,y) a via of type N, cw(c..) or ccw(c..) an arc to the next point about the centre after c; other vN are vias at no path point)
+9_1: 
+9_2: 
+12: C13.2 C14.2 C15.2 C16.2 C17.2 C18.2 IC1.4 IC2.8 IC3.14 IC4.1 IC6.16 IC7.16 R1.2 R5.1 R13.2 R14.2 R16.2 R23.2 SW1.3 X3.1 X3.2 | length 1
  Top Layer w0.203: v1(73.152,81.661) 73.152,80.723 R14.2
+12_IDC: 
-12: C8.1 C19.1 C20.1 C21.1 C22.1 C23.1 C24.1 IC1.11 IC2.4 IC4.7 R10.1 X3.5 X3.6
-12_IDC: 
B1: IC4.9 IC6.2 R28.2 SW2.7 X4.1 X5.1 | length 87.8
  Top Layer w0.203: v1(61.976,107.95) 61.341,108.585 60.452,108.585 60.452,119.406 61.087,120.041 61.751,120.041 62.331,120.621 62.331,126.855 62.857,127.381 67.818,127.381 69.342,125.857 69.596,125.857 70.055,125.398 71.633,125.398 72.989,126.753 SW2.7 ; v1(73.783,104.127) 74.547,103.363 77.358,103.363 77.876,102.845 77.876,102.685 79.453,101.108 79.613,101.108 79.883,100.838 79.883,98.094 80.088,97.888 v1(80.088,97.044) 80.516,96.616 80.516,95.763 79.832,95.079 79.832,90.865 80.542,90.155 80.542,84.198 80.516,84.172 v1(80.516,83.201) ; v1(75.955,97.171) R28.2
  Bottom Layer w0.203: X4.1 62.343,106.158 ; v1(61.976,107.95) 61.976,106.524 62.343,106.158 ; v1(73.783,104.127) 73.041,104.127 72.277,103.363 70.246,103.363 X5.1 67.451,106.158 62.343,106.158 ; v1(75.955,97.171) 77.929,97.171 IC6.2 ; IC6.2@78.114,97.044 v1(80.088,97.044) ; v1(80.516,83.201) IC4.9
B2: IC4.10 IC6.3 SW2.6 X4.2 X5.2 | length 81.2
  Top Layer w0.203: X4.2 61.378,107.151 60.997,107.151 v1(60.96,107.188) 60.882,107.266 60.687,107.266 60.638,107.315 60.046,107.315 60.046,127.795 60.165,127.914 67.666,127.914 67.793,127.787 67.986,127.787 69.02,126.753 SW2.6 ; v1(74.943,104.138) 75.704,104.138 75.829,104.013 77.343,104.013 78.283,103.073 78.283,102.873 78.521,102.635 78.521,102.616 79.622,101.515 79.841,101.515 80.289,101.067 80.289,99.465 80.596,99.158 v1(80.596,98.314) 81.024,97.886 81.024,95.696 80.239,94.91 80.239,91.033 81.177,90.095 81.177,82.928 81.024,82.775 v1(81.024,81.931)
  Bottom Layer w0.203: X5.2 66.435,104.634 67.197,104.634 67.451,104.38 67.451,104.305 68.139,103.618 69.417,103.618 70.078,102.957 73.546,102.957 74.428,103.838 74.533,103.838 74.833,104.138 v1(74.943,104.138) ; IC6.3@78.114,98.314 v1(80.596,98.314) ; v1(81.024,81.931) IC4.10
  Bottom Layer w0.254: X4.2 X5.2
B3: IC4.11 IC6.4 SW2.5 X4.3 X5.3 | length 82.8
  Top Layer w0.203: X4.3 61.354,102.629 62.118,102.629 63.107,103.618 64.118,103.618 64.883,104.382 64.883,105.977 62.357,108.503 v1(62.357,109.093) 61.468,109.982 60.858,109.982 60.858,118.771 61.722,119.635 61.919,119.635 62.737,120.453 62.737,124.046 62.857,124.165 SW2.5 ; v1(75.08,104.991) 75.19,104.991 75.497,104.684 77.247,104.684 78.016,103.915 78.211,103.915 78.689,103.437 78.689,103.041 78.927,102.804 78.927,102.784 79.79,101.921 80.01,101.921 80.696,101.235 80.696,100.406 81.083,100.019 81.083,99.606 v1(81.104,99.584) 81.532,99.156 81.532,95.629 80.645,94.742 80.645,91.201 81.685,90.162 81.685,81.658 81.532,81.505 v1(81.532,80.661)
  Bottom Layer w0.203: X4.3 62.343,103.618 67.451,103.618 X5.3 73.527,102.362 74.596,103.432 75.171,103.432 75.604,103.864 75.604,104.467 v1(75.08,104.991) ; IC6.4@78.114,99.584 v1(81.104,99.584) ; v1(81.532,80.661) IC4.11
B4: IC4.12 IC6.5 SW2.4 X4.4 X5.4 | length 73.8
  Top Layer w0.203: SW2.4 61.265,116.946 61.265,111.379 61.655,111.379 61.681,111.354 61.747,111.354 v1(62.738,110.363) 62.738,109.646 64.77,107.614 64.77,106.665 65.277,106.158 66.687,106.158 67.423,105.422 67.423,103.618 X5.4 ; v1(75.972,105.419) 75.994,105.419 76.244,105.169 76.244,105.156 77.705,105.156 79.333,103.527 79.333,102.953 79.958,102.328 80.266,102.328 v1(81.739,100.854) 81.765,100.829 81.765,99.499 81.939,99.325 81.939,95.461 81.051,94.574 81.051,91.37 82.193,90.228 82.193,80.388 82.167,80.362 v1(82.167,79.391)
  Bottom Layer w0.203: X5.4 66.364,102.165 67.253,102.165 67.451,101.967 67.451,101.842 68.187,101.106 69.227,101.106 70.076,101.956 73.695,101.956 74.765,103.025 75.339,103.025 76.01,103.696 76.01,104.635 75.972,104.673 v1(75.972,105.419) ; IC6.5@78.114,100.854 v1(81.739,100.854) ; v1(82.167,79.391) IC4.12
  Bottom Layer w0.254: X4.4 X5.4
B5: IC4.13 IC6.10 R27.2 SW2.3 X4.5 X5.5 | length 88.9
  Top Layer w0.203: X4.5 61.354,100.089 62.118,100.089 63.107,101.078 69.198,101.078 69.963,101.842 69.963,105.499 69.304,106.158 68.11,106.158 68.099,106.147 67.273,106.147 66.855,106.564 66.656,106.564 66.421,106.799 66.421,106.934 65.151,108.204 65.151,108.458 63.627,109.982 63.627,110.408 63.012,111.023 62.652,111.023 61.849,111.827 61.849,112.354 SW2.3 ; R27.2 83.429,103.521 84.15,104.242 84.15,104.903 84.572,105.325 85.119,105.325 85.506,104.938 85.506,103.42 v1(85.48,103.394) 85.48,102.55 85.328,102.398 85.328,101.851 85.48,101.698 85.48,99.238 85.658,99.06 85.658,98.74 85.912,98.486 85.912,96.358 85.48,95.926 85.48,95.121 85.979,94.623 85.979,91.507 85.48,91.008 85.48,85.855 85.563,85.772 85.563,80.619 85.48,80.536 v1(85.48,78.121)
  Bottom Layer w0.203: X4.5 62.343,101.078 67.104,101.078 68.36,99.822 X5.5 70.434,101.549 73.863,101.549 74.933,102.619 75.898,102.619 75.946,102.667 75.971,102.667 76.886,103.581 76.886,103.683 76.976,103.773 76.976,103.846 77.155,104.024 78.947,104.024 78.978,104.055 80.674,104.055 81.334,103.394 IC6.10 v1(85.48,103.394) ; IC4.13 v1(85.48,78.121)
B6: IC4.14 IC6.11 SW2.2 X4.6 X5.6 | length 72.6
  Top Layer w0.203: X5.6 67.423,98.566 69.227,98.566 70.369,99.708 70.369,105.668 69.473,106.564 67.941,106.564 67.93,106.553 67.441,106.553 66.589,107.405 SW2.2 ; v1(85.988,76.851) 85.988,77.695 86.141,77.848 86.141,88.062 85.887,88.316 85.887,90.84 86.487,91.44 86.487,92.754 86.385,92.856 86.385,94.791 86.318,94.858 86.318,98.654 86.064,98.908 86.064,99.229 85.887,99.406 85.887,101.179 85.988,101.28 v1(85.988,102.124)
  Bottom Layer w0.203: X5.6 67.31,99.822 67.451,99.681 67.451,99.302 68.187,98.566 69.227,98.566 69.963,99.302 69.963,100.503 70.425,100.965 74.213,100.965 75.254,102.006 76.22,102.006 76.27,101.956 76.356,101.956 77.155,102.754 78.983,102.754 79.613,102.124 IC6.11 v1(85.988,102.124) ; IC4.14 v1(85.988,76.851)
  Bottom Layer w0.254: X4.6 X5.6
B7: IC4.15 IC6.12 SW2.1 X6.1 X7.1 | length 72
  Top Layer w0.203: v1(74.117,105.067) 74.074,105.067 73.794,104.788 73.51,104.788 73.123,104.401 73.123,103.854 73.51,103.467 73.69,103.467 74.295,102.862 74.295,102.743 75.184,101.854 v1(75.184,100.457) 75.184,100.43 74.888,100.135 74.888,96.063 75.184,95.768 75.184,95.123 v1(74.803,94.742) ; v1(86.471,75.581) 86.496,75.607 86.496,76.425 86.649,76.578 86.649,88.129 86.471,88.307 86.471,90.805 86.928,91.262 86.928,92.888 86.792,93.024 86.792,94.959 86.725,95.026 86.725,98.822 86.471,99.076 86.471,99.858 86.496,99.883 86.496,100.804 v1(86.547,100.854)
  Bottom Layer w0.203: X6.1 62.343,95.998 67.451,95.998 X7.1 v1(74.803,94.742) ; SW2.1 73.44,105.067 v1(74.117,105.067) ; v1(75.184,100.457) 76.128,100.457 77.155,101.484 78.947,101.484 78.978,101.515 82.013,101.515 82.4,101.128 82.4,100.973 82.519,100.854 IC6.12 v1(86.547,100.854) ; IC4.15 v1(86.471,75.581)
B8: IC4.16 IC6.13 X6.2 X7.2 | length 60.1
  Top Layer w0.203: v1(75.311,93.726) 75.311,93.836 75.641,94.166 75.641,94.295 75.844,94.498 75.844,95.682 75.295,96.232 75.295,97.445 75.946,98.096 v1(75.946,99.695) ; v1(87.131,74.311) 87.131,88.265 87.334,88.468 87.334,95.546 87.131,95.749 v1(87.131,99.584)
  Bottom Layer w0.203: X6.2 X7.2 67.332,94.742 67.451,94.623 67.451,94.145 68.11,93.486 69.304,93.486 69.633,93.816 74.989,93.816 75.001,93.804 75.233,93.804 v1(75.311,93.726) ; v1(75.946,99.695) 76.636,99.695 77.155,100.214 78.947,100.214 78.978,100.245 81.378,100.245 82.038,99.584 IC6.13 v1(87.131,99.584) ; IC4.16 v1(87.131,74.311)
BUFFCLK1: 
BUFFCLK2: 
CHANGE_B: R10.2 X2.5 X2.6
CHANGE_T: R5.2 X2.1 X2.2
CHANGE_W: R9.1 X2.3 X2.4
CLK: D1.2 IC6.1 IC6.9 IC7.1 IC7.9 R15.2 R21.2 X6.3 X7.3 | length 63.9
  Top Layer w0.203: v1(75.692,92.202) 75.692,93.173 76.048,93.529 76.048,94.127 76.79,94.869 v1(78.041,94.869) 78.978,93.933 78.978,90.57 79.257,90.29 79.257,86.675 79.105,86.523 79.105,85.976 79.638,85.442 v1(79.638,84.979) ; v1(84.82,93.869) 84.82,95.885 85.506,96.571 85.506,98.317 85.252,98.571 85.252,98.892 84.957,99.187 84.82,99.187 84.82,104.639 v1(84.845,104.664)
  Bottom Layer w0.203: X6.3 62.343,93.458 67.451,93.458 X7.3 v1(75.692,92.202) ; v1@77.987,94.885 78.025,94.885 v1(78.041,94.869) 78.056,94.884 IC6.1 79.384,95.774 81.289,93.869 IC7.9 v1(84.82,93.869) ; IC7.1 v1(79.638,84.979) ; R15.2 82.169,107.823 82.906,108.56 R21.2 85.979,105.798 v1(84.845,104.664) IC6.9
G1: 
G2: 
G3: 
G4: 
G5: 
G6: 
G7: 
G8: 
GND: C5.1 C6.1 C7.1 C10.1 C11.1 C12.1 C13.1 C14.1 C15.1 C16.1 C17.1 C18.1 C19.2 C20.2 C21.2 C22.2 C23.2 C24.2 IC1.3 IC1.5 IC1.12 IC2.3 IC3.7 IC3.9 IC3.10 IC4.5 IC4.8 IC5.3 IC6.6 IC6.8 IC6.14 IC7.6 IC7.8 IC7.14 J1.1 J2.1 J3.1 J4.1 J5.1 Q1.1 R7.2 R20.1 R21.1 R22.1 R25.2 SW1.1 X1.5 X1.6 X3.3 X3.4 X6.5 X6.6 | length 16.8
  Top Layer w0.203: v1(83.058,106.045) 83.078,106.025 C10.1
  Bottom Layer w0.203: X6.5 X6.6 ; v1(75.946,101.346) 76.321,101.346 77.095,102.12 78.052,102.12 IC6.6 ; v1(76.2,90.805) 76.724,91.329 IC7.6 ; v1(76.708,79.375) 76.724,79.391 IC4.5 ; v1(76.708,83.185) 76.724,83.201 IC4.8 ; v1(76.708,93.853) 76.724,93.869 IC7.8 ; v1(76.835,124.968) 76.835,125.037 78.237,126.439 Q1.1 ; IC6.14 83.956,98.314 84.279,97.991 84.603,97.991 84.735,97.859 v1(84.845,97.859)
NetC1_1: C1.1 C4.2 IC1.7 VR1.2 VR1.3 | length 36.3
  Top Layer w0.203: v1(81.28,119.761) IC1.7
  Bottom Layer w0.203: VR1.2 VR1.3 62.564,119.808 62.564,119.202 63.439,118.327 64.562,118.327 65.87,119.634 77.933,119.634 78.466,119.101 79.014,119.101 79.801,119.888 81.153,119.888 v1(81.28,119.761) ; IC1.7 81.531,121.572 81.799,121.84 81.835,121.84 82.597,122.602 C4.2 84.459,122.733 85.014,122.733 85.228,122.947 85.228,122.954 85.407,123.133 87.059,123.133 87.334,122.858 87.334,121.666 86.998,121.329 86.531,121.329 C1.1
NetC2_1: C2.1 IC1.1 R8.2 | length 24.9
  Bottom Layer w0.203: R8.2 68.735,123.571 68.437,123.273 68.437,123.223 66.791,121.577 66.045,121.577 IC1.1 67.278,121.572 68.199,120.651 81.661,120.651 82.857,121.847 84.954,121.847 85.133,122.026 85.133,122.047 85.347,122.261 86.066,122.261 C2.1
NetC2_2: C2.2 R2.2 | length 3.7
  Bottom Layer w0.203: R2.2@82.726,125.984 R2.2 83.771,125.906 84.201,125.476 86.185,125.476 C2.2
NetC3_1: C3.1 Q1.2 R1.1 | length 6.4
  Bottom Layer w0.203: C3.1 78.311,125.939 79.178,126.805 79.178,127.057 79.502,127.381 Q1.2 81.661,127.381 R1.1
NetC3_2: C3.2 R4.2 | length 1.7
  Bottom Layer w0.203: R4.2 75.057,123.571 C3.2
NetC4_1: C4.1 IC1.6 R2.1 VR1.1 | length 29.5
  Top Layer w0.203: v1(78.74,119.761) IC1.6
  Bottom Layer w0.203: VR1.1 65.119,122.333 65.119,120.86 65.734,120.245 78.256,120.245 v1(78.74,119.761) ; IC1.6 79.978,121.572 81.216,122.809 81.407,122.809 82.456,123.858 82.506,123.858 82.804,124.156 R2.1 84.074,124.206 C4.1
NetC5_2: C5.2 IC1.10 R15.1 R17.1 R20.2 | length 12.6
  Bottom Layer w0.203: C5.2 R20.2 R20.2@74.345,109.601 ; IC1.10 75.311,112.743 75.311,110.617 74.643,109.949 74.643,109.899 R20.2@74.345,109.601 ; R17.1 R15.1@78.613,107.784 ; R15.1 78.602,107.823 78.304,108.121 78.304,108.171 76.874,109.601 R20.2@74.345,109.601
NetC7_2: C7.2 IC1.9 R16.1 R22.2 | length 4.7
  Bottom Layer w0.203: R22.2 78.613,112.014 C7.2 ; IC1.9 78.74,112.395 C7.2 ; R16.1 C7.2
NetC8_2: C8.2 IC4.4 | length 2.9
  Top Layer w0.203: v1(76.59,78.121) C8.2
  Bottom Layer w0.203: v1(76.59,78.121) IC4.4
NetC9_1: C9.1 IC1.13 IC4.6 R26.1 | length 3.5
  Bottom Layer w0.203: R26.1 C9.1@69.245,112.014 ; IC1.13 68.58,112.729 68.944,112.365 68.944,112.315 C9.1@69.245,112.014 ; C9.1 69.292,111.967 C9.1@69.245,112.014
NetC10_2: C10.2 IC6.7 R27.1 | length 5.1
  Top Layer w0.203: v1(80.4,103.394) 81.552,103.394 R27.1 81.728,103.57 C10.2
  Bottom Layer w0.203: IC6.7 v1(80.4,103.394)
NetC11_2: C11.2 IC7.15 R28.1 | length 16.4
  Top Layer w0.203: C11.2 78.896,98.519 R28.1 78.896,96.262 79.384,95.774 79.384,90.738 79.765,90.357 v1(79.765,86.249)
  Bottom Layer w0.203: v1(79.765,86.249) IC7.15
NetD1_1: D1.1 IC1.8 | length 3.8
  Bottom Layer w0.203: IC1.8 81.531,113.632 81.792,113.371 81.842,113.371 83.326,111.887 84.176,111.887 D1.1
NetD2_2: 
NetD3_2: 
NetD4_2: 
NetD5_2: 
NetD6_2: 
NetD7_2: 
NetD8_2: 
NetD9_2: 
NetD10_1: 
NetD11_1: 
NetIC1_2: IC1.2 R4.1 R8.1 | length 4.3
  Bottom Layer w0.203: IC1.2 68.58,121.666 70.137,123.223 70.137,123.273 70.435,123.571 R8.1 R4.1
NetIC2_1: IC2.1 IC2.6 R11.2 | length 9.5
  Top Layer w0.203: v1(67.056,71.755) R11.2
  Bottom Layer w0.203: v1(67.056,71.755) 70.12,71.755 72.585,74.221 73.687,74.221 IC2.1
NetIC2_2: IC2.2 R9.2 R11.1 R18.2 | length 4.1
  Top Layer w0.203: R11.1 v1(71.628,71.755)
  Bottom Layer w0.203: v1(71.628,71.755) 71.628,72.263 72.39,73.025 IC2.2
NetIC2_7: IC2.7 R6.1 | length 3.6
  Top Layer w0.203: v1(67.056,73.025) R6.1
  Bottom Layer w0.203: v1(67.056,73.025) IC2.7
NetIC3_1: IC3.1 IC3.6 SW2.A | length 11.6
  Top Layer w0.203: v1(66.294,83.185) 66.294,81.706 65.1,80.512 65.1,78.407 65.975,77.532 66.105,77.532 v1(67.818,75.819)
  Bottom Layer w0.203: v1(66.294,83.185) IC3.6 ; IC3.1 67.818,76.829 v1(67.818,75.819)
NetIC3_2: IC3.2 IC3.4 R19.2 | length 6.5
  Top Layer w0.203: v1(66.252,78.19) 66.142,78.19 65.777,78.555 65.717,78.555 65.507,78.765 65.507,79.985 v1(66.167,80.645) R19.2
  Bottom Layer w0.203: v1(66.252,78.19) 67.727,78.19 IC3.2
NetIC3_3: IC3.3 IC3.8 R13.1 | length 15.1
  Top Layer w0.203: v1(66.167,79.375) R13.1 ; v1(72.39,84.455) 72.39,80.137 v1(73.152,79.375)
  Bottom Layer w0.203: IC3.3 v1(73.152,79.375) ; v1(72.39,84.455) IC3.8
NetIC3_5: IC3.5 IC3.11 R14.1 | length 10.7
  Top Layer w0.203: R14.1 v1(76.454,80.645)
  Bottom Layer w0.203: IC3.5 70.358,81.915 71.628,80.645 IC3.11 v1(76.454,80.645)
NetIC3_12: IC3.12 IC3.13 R6.2 | length 10.8
  Top Layer w0.203: R6.2 70.534,78.123 v1(70.546,78.135)
  Bottom Layer w0.203: v1(70.546,78.135) 74.906,78.135 IC3.13 IC3.12
NetIC4_2: IC4.2 R24.1 | length 2.9
  Top Layer w0.203: v1(76.59,75.581) R24.1
  Bottom Layer w0.203: v1(76.59,75.581) IC4.2
NetIC4_3: IC4.3 R25.1 | length 2.9
  Top Layer w0.203: v1(76.59,76.851) R25.1
  Bottom Layer w0.203: v1(76.59,76.851) IC4.3
NetIC5_1: IC5.1 IC5.2 R23.1 R24.2 | length 5
  Top Layer w0.203: R24.2 IC5.1 IC5.2 83.189,74.062 R23.1
NetIC7_10: IC7.10 R29.2 | length 2.7
  Top Layer w0.203: R29.2 83.557,92.549 v1(84.82,92.549)
  Bottom Layer w0.203: IC7.10 83.557,92.549 v1(84.82,92.549)
NetJ1_3: J1.3 R17.2 | length 7.7
  Bottom Layer w0.203: v1(73.279,106.68) 73.88,106.079 76.246,106.079 76.477,105.848 79.608,105.848 79.965,106.205 79.965,106.255 80.263,106.553 R17.2
NetJ2_3: J2.3 R12.1
NetJ3_3: J3.3 R18.1
NetR3_2: R3.2 SW1.2
NOISE: C1.2 IC2.5 R7.1 R12.2 | length 2.4
  Bottom Layer w0.203: v1(85.598,116.586) R7.1 86.487,117.777 C1.2
P1: 
P2: 
P3: 
P4: 
P5: 
P6: 
P7: 
P8: 
PULSE_OUT: J4.3 X6.4 X7.4 | length 11.9
  Bottom Layer w0.203: X6.4 X7.4 66.364,92.005 67.253,92.005 67.451,91.807 67.451,91.682 68.187,90.946 69.227,90.946 69.721,91.44 72.098,91.44 72.207,91.332 v1(74.695,91.332)
SCALE_B: 
SCALE_T: C9.2 IC1.14 R26.2 X1.1 X1.2 | length 5.6
  Bottom Layer w0.203: IC1.14 R26.2 66.168,111.886 66.676,111.886 66.985,111.577 66.985,111.488 67.164,111.309 68.619,111.309 68.716,111.212 68.747,111.212 68.944,111.015 68.944,110.965 69.292,110.617 C9.2